# Altium PCB PCB_main_single_side_STACK.PcbDoc (part 2 of 2)
Units mm, origin at the board's own origin, x right, y up, seen from the top; angles counter-clockwise.
Board outline 58 x 37 mm, 2 copper layers (Top Layer, Bottom Layer), stack 1.571 mm thick; 67 components, 56 nets, 287 pads, 90 vias.
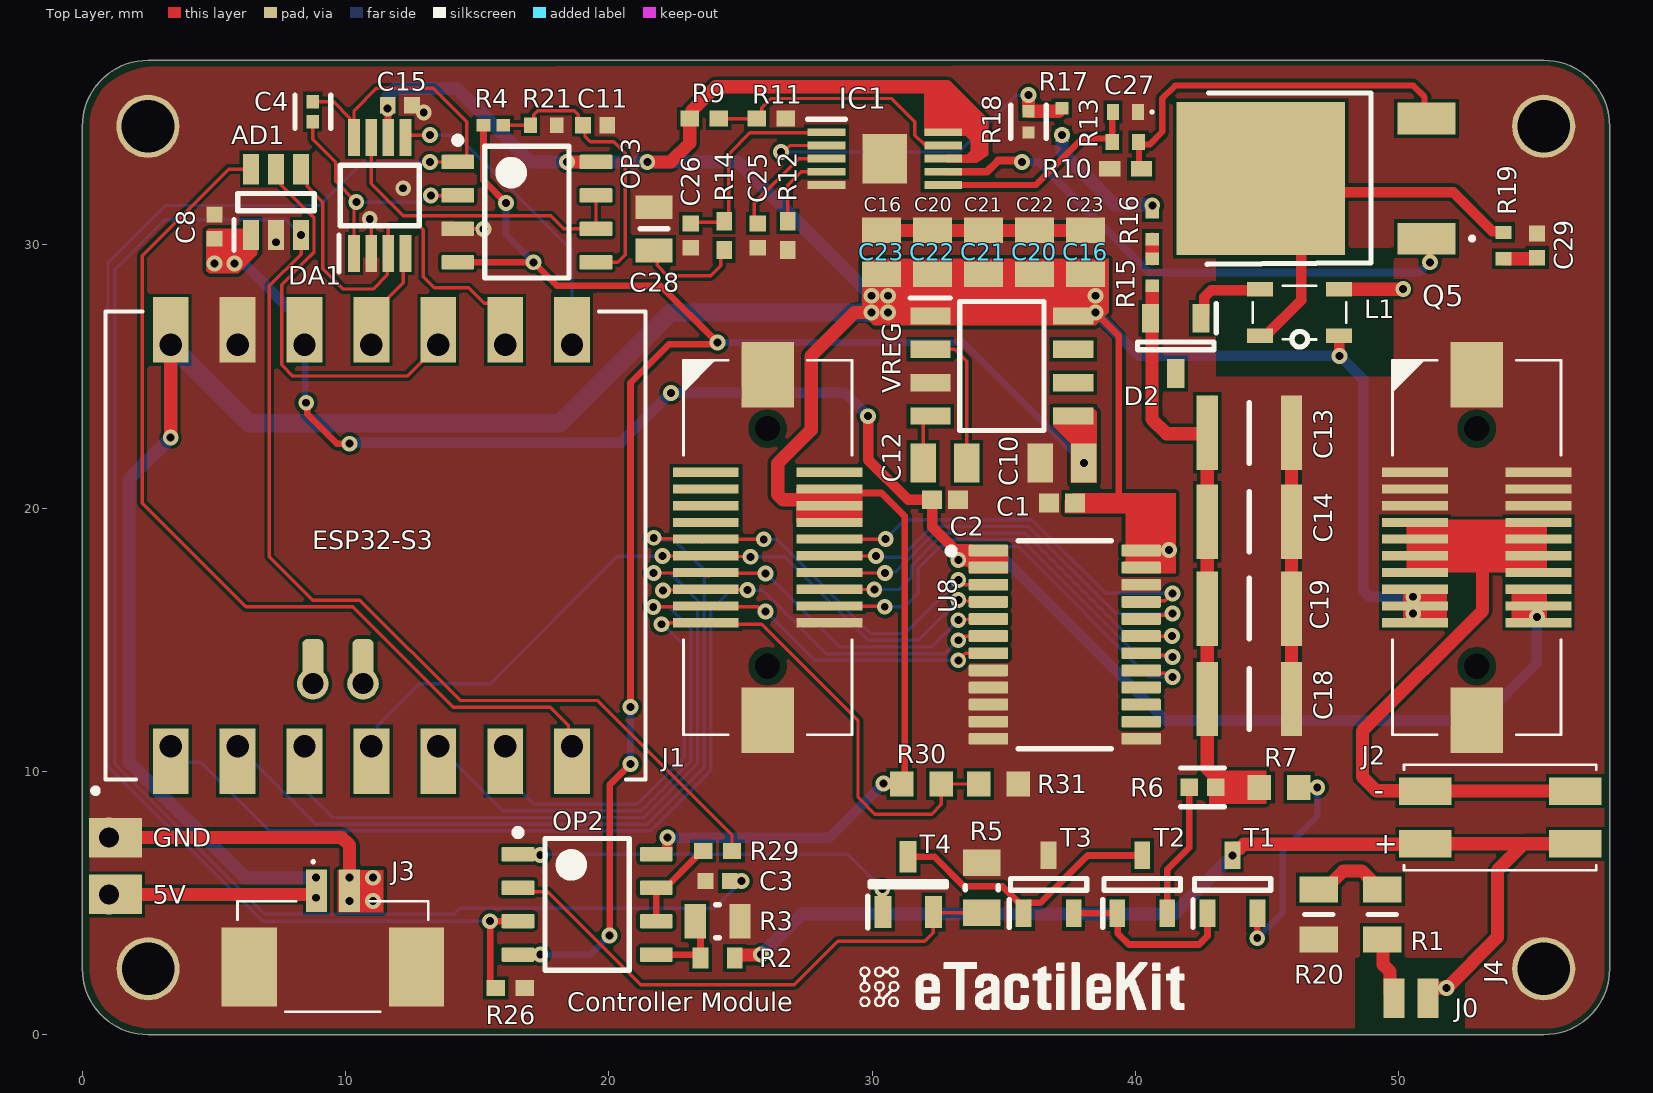
[diagram p0: Top Layer view]

## Via types
v1: diameter 0.6, hole 0.3, Top Layer to Bottom Layer, tented both sides, 90 vias

## Nets (pads, with @x,y where several pads share a name; then routed paths per layer and width w, separated by ;. In a path a pad name is that pad's centre, name@x,y a point inside that pad or via, vN(x,y) a via of type N, cw(c..) or ccw(c..) an arc to the next point about the centre after c; other vN are vias at no path point) (continued)
NetC28_2: (continued)
  Top Layer w0.127: C28.2 21.838,29.666 21.838,29.216 22.225,28.829 23.876,28.829 24.249,29.202 R14.1@24.249,29.668
  Top Layer w0.254: R14.1@24.249,29.668 R14.1
NetC29_2: C29.2 R19.2 | length 1.1
  Top Layer w0.5: R19.2 C29.2@55.051,29.472
NetD2_1: D2.1 L1.2 | length 3.1
  Top Layer w0.4: D2.1 42.614,27.337 42.614,28.009 42.885,28.28 44.701,28.28 L1.2
NetIC1_4: IC1.4 R12.2 | length 3.2
  Top Layer w0.127: R12.2 26.797,32.258 27.313,32.774 IC1.4@28.395,32.774
NetJ0_2: J0.2 R1.1 | length 2.4
  Top Layer w0.5: R1.1 49.405,3.59 49.405,2.665 49.666,2.404 49.666,1.547 J0.2
NetL1_1: L1.1 Q5.2 R19.1 | length 18
  Top Layer w0.4: L1.1 44.953,26.557 46.291,27.895 Q5.2@46.291,32.004 ; R19.1 53.929,30.522 53.552,30.522 52.07,32.004 Q5.2@46.291,32.004 ; Q5.2@45.777,32.518 Q5.2@46.291,32.004 ; Q5.2@45.777,32.518 Q5.2 Q5.2@45.777,32.518 ; Q5.2@45.777,32.518 Q5.2@46.291,32.004
NetOP2_1: OP2.1 T4.1 | length 15.3
  Top Layer w0.254: OP2.1 16.564,6.846 17.387,6.846 v1(17.399,6.833) ; v1(30.387,5.543) 30.4,5.529 30.4,4.679 T4.1@30.414,4.665
  Bottom Layer w0.127: v1(17.399,6.833) 17.424,6.858 29.071,6.858 v1(30.387,5.543)
NetOP2_2: OP2.2 R5.2 T4.2 | length 20.7
  Top Layer w0.127: OP2.2 16.7,5.44 17.674,5.44 21.209,1.905 27.051,1.905 28.702,3.556 32.004,3.556 32.324,3.876 32.324,4.609 32.352,4.637 R5.2
NetOP2_5: OP2.5 R2.1 R3.2 | length 3.2
  Top Layer w0.254: OP2.5 23.353,3.048 R2.1 23.48,4.117 R3.2
NetOP2_6: OP2.6 OP2.7 R29.1 | length 3.6
  Top Layer w0.254: OP2.6 OP2.7 22.152,5.588 23.357,6.793 23.357,6.812 23.53,6.985 R29.1
NetQ5_3: Q5.3 R10.2 R13.1 | length 14.6
  Top Layer w0.24: R13.1 R13.1@40.136,33.885 ; R13.1@40.136,33.925 R13.1@40.136,33.885 ; R10.2@40.244,32.996 40.136,33.105 R13.1@40.136,33.885 ; Q5.3 50.977,34.875 50.977,35.617 50.546,36.048 41.509,36.048 41.021,35.56 41.021,34.29 40.542,33.811 40.21,33.811 R13.1@40.136,33.885
NetR1_2: R1.2 R20.1 | length 3.1
  Top Layer w0.5: R20.1 47.185,5.522 47.886,6.223 48.605,6.223 48.898,5.93 48.898,5.772 49.098,5.572 R1.2@49.437,5.572
NetR6_1: R6.1 T2.2 | length 5
  Top Layer w0.254: T2.2 41.209,6.284 42.043,7.118 R6.1@42.043,9.271
NetR7_1: R7.1 T1.2 | length 8.3
  Top Layer w0.127: T1.2@44.625,4.602 T1.2
  Top Layer w0.254: v1(44.625,3.673) T1.2@44.625,4.602 ; R7.1 v1(46.904,9.398)
  Bottom Layer w0.254: v1(44.625,3.673) 45.593,4.641 45.593,6.985 46.904,8.296 v1(46.904,9.398)
NetR15_1: R15.1 R16.2 | length 0.8
  Top Layer w0.5: R15.1 R16.2
NetR16_1: R16.1 R17.2 | length 4.9
  Bottom Layer w0.5: v1(37.207,34.171) 37.207,33.532 39.219,31.52 40.621,31.52 v1(40.64,31.501)
NetT1_1: T1.1 T2.1 T3.2 | length 7
  Top Layer w0.254: T3.2 T2.1 39.322,4.602 39.322,3.858 39.751,3.429 42.418,3.429 42.738,3.749 T1.1
NetT2_3: T2.3 T3.1 T4.3 | length 10.7
  Top Layer w0.254: T4.3 32.37,6.765 33.495,5.64 34.953,5.64 T3.1@35.753,4.84 ; T3.1 T3.1@35.753,4.84 ; T2.3 38.184,6.815 36.382,5.013 35.926,5.013 T3.1@35.753,4.84
POL: J1.14 U8.19 | length 16.4
  Top Layer w0.127: J1.14@28.342,17.526 28.358,17.542 30.489,17.542 v1(30.494,17.537) ; U8.19@40.279,15.143 v1(41.382,15.144)
  Bottom Layer w0.127: v1(30.494,17.537) 30.535,17.579 30.892,17.579 32.363,19.05 35.814,19.05 39.72,15.144 v1(41.382,15.144)
SENSE: C27.2 IC1.6 R13.2 | length 8.2
  Top Layer w0.127: C27.2@39.116,34.968 cw(c39.229,34.968) C27.2
  Top Layer w0.24: IC1.6@32.819,32.274 36.211,32.274 37.973,34.036 38.986,34.036 R13.2@39.116,33.906
  Top Layer w0.254: R13.2 C27.2@39.116,34.968
SHDN: IC1.9 R9.1 R11.2 | length 10.1
  Top Layer w0.127: R9.1 R11.2 25.812,34.994 25.812,35.21 26.162,35.56 30.734,35.56 31.623,34.671 31.623,34.163 31.99,33.796 32.797,33.796 IC1.9@32.819,33.774
SPI_CLK: AD1.4 DA1.3 ESP32-S3.9 | length 16.6
  Top Layer w0.127: AD1.4@8.382,33.062 8.55,32.894 8.55,32.217 9.144,31.623 9.144,29.086 9.909,28.321 11.049,28.321 11.589,28.861 11.589,29.638 DA1.3 11.628,30.623 11.702,30.697 12.19,30.697 12.22,30.727 12.803,30.727 12.954,30.576 12.954,28.776 ; 12.954,28.794 13.379,28.368 14.685,28.368 15.27,27.783 15.628,27.783 16.066,27.345 ESP32-S3.9@16.066,26.774
STACK_SENSE: ESP32-S3.6 J1.19 R30.1 R31.2 | length 31.1
  Top Layer w0.127: v1(21.998,15.594) 22.048,15.644 J1.19@23.684,15.644 ; J1.19@24.809,15.594 25.802,15.594 29.464,11.932 29.464,9.017 30.099,8.382 32.258,8.382 32.627,8.751 R30.1 R31.2
  Bottom Layer w0.127: ESP32-S3.6@16.066,10.963 16.066,9.842 17.145,8.763 21.082,8.763 22.86,10.541 22.86,14.789 22.055,15.594 v1(21.998,15.594)
Vout: C4.1 DA1.8 OP2.3 OP3.1 R26.1 | length 64.5
  Top Layer w0.127: C4.1 9.552,35.431 10.166,34.816 10.166,34.714 10.226,34.654 DA1.8@10.328,34.654 ; DA1.8 DA1.8@10.328,34.654 ; v1(13.208,33.147) OP3.1 14.393,33.147 14.605,33.359 14.605,34.671 13.335,35.941 11.176,35.941 10.328,35.093 DA1.8@10.328,34.654
  Top Layer w0.254: R26.1 15.667,1.778 15.494,1.951 v1(15.494,4.318) OP2.3
  Bottom Layer w0.127: v1(13.208,33.147) 10.668,33.147 9.017,31.496 3.175,31.496 0.983,29.304 0.983,10.193 6.858,4.318 v1(15.494,4.318)
VPP: J2.7 J2.8 J2.9 J2.10 J2.11 J2.12 J2.13 J2.14 J4.1 J4.MP1 | length 20.3
  Top Layer w0.5: J2.11@51.245,18.035 51.32,18.109 51.862,18.109 51.866,18.114 52.734,18.114 52.813,18.034 52.887,18.034 53.18,17.741 53.18,16.107 48.615,11.542 48.615,9.805 49.149,9.271 50.982,9.271 J4.MP1 J4.1
Vref: DA1.7 OP3.6 OP3.7 | length 11.9
  Top Layer w0.127: DA1.7@10.978,33.696 10.978,32.329 12.204,31.103 17.792,31.103 18.288,30.607 OP3.6 OP3.7
pads on no net: D2.3 J1.1 J1.2 J1.3 J1.5 J1.7 J1.23 J1.24 J2.23 J2.24 U8.14 U8.15 U8.16 VREG.6 VREG.7

## Polygon pours and split planes (outlines as drawn)
GND on Top Layer "GND_L01_P000" (solid, pour order 0): 0.284,34.533 cw(c2.613,34.466) 0.89,36.035 cw(c2.802,33.937) 2.949,36.772 55.366,36.828 cw(c55.366,34.289) 57.162,36.084 57.18,36.066 cw(c55.648,34.533) 57.815,34.533 57.815,2.66 cw(c55.487,2.569) 56.629,0.539 cw(c55.689,1.935) 55.721,0.252 2.594,0.252 cw(c2.634,2.753) 0.914,0.937 cw(c2.809,2.606) 0.284,2.593
GND on Bottom Layer "GND_L02_P001" (solid, pour order 1): 0.277,34.645 cw(c2.606,34.578) 0.883,36.147 cw(c2.795,34.05) 2.942,36.885 55.359,36.94 cw(c55.359,34.401) 57.155,36.196 57.173,36.178 cw(c55.641,34.646) 57.808,34.645 57.808,2.772 cw(c55.48,2.682) 56.622,0.652 cw(c55.682,2.047) 55.714,0.364 2.587,0.364 cw(c2.627,2.865) 0.907,1.05 cw(c2.802,2.718) 0.277,2.706

## Other copper
Top Layer:
  region net GND: 9.703,6.257 9.703,4.658 10.588,4.658 11.43,4.658 11.43,6.264
  region net +5V: 31.98,34.139 33.552,34.139 33.742,33.949 33.742,33.573 33.584,33.416 32.819,33.416 32.819,33.127 33.974,33.127 34.417,33.401 34.417,34.681 31.98,36.241
  region net +5V: 50.165,16.954 50.165,15.557 51.816,15.557 51.816,16.954
  region net +5V: 37.317,20.299 37.592,20.574 39.243,20.574 39.497,20.574 41.529,20.574 41.529,17.526 39.624,17.526 39.624,19.812 37.317,19.812
  region net +5V: 29.622,28.412 29.622,27.376 30.058,26.94 33.036,26.94 38.497,26.94 38.99,27.433 38.99,29.464 29.845,29.464 29.718,29.337
  region net +5V: 27.115,20.752 29.621,20.752 29.621,19.452 27.115,19.452
  region net VPP: 50.292,19.558 55.626,19.558 55.626,17.564 50.292,17.564
  pour cut-out: 48.323,2.921 48.323,0.127 52.514,0.127 52.514,2.921
  region net -5: 36.891,23.819 38.383,23.819 38.538,23.665 38.538,20.967 37.56,20.967 37.545,20.982 37.545,22.452 36.876,23.121 36.876,23.812
  region net +3V3: 4.719,30.534 4.793,30.607 6.568,30.607 6.659,30.516 6.659,29.652 5.925,28.918 4.822,28.918 4.721,29.019 4.721,30.533
  region net +3V3: 33.679,17.526 33.679,17.704 33.589,17.794 33.133,17.794 33.019,17.908 33.019,18.528 33.525,18.528 33.765,18.288
  region net +3V3: 33.679,18.462 33.679,17.526 35.165,17.526 35.165,18.558 33.674,18.558
  region net +3V3: 54.285,16.934 54.285,15.643 55.626,15.643 55.626,16.934
  region net +300V: 44.831,10.033 42.799,10.033 42.799,9.626 42.799,9.017 42.799,8.775 44.958,8.775 44.958,8.89 44.958,10.033
Bottom Layer:
  region net +5V: 29.622,27.376 cw(c29.698,27.452) 29.591,27.452 29.591,28.194 cw(c30.187,27.785) 29.793,28.391 cw(c30.139,27.399) 30.204,28.448 30.607,28.448 cw(c30.587,28.014) 30.908,28.307 30.988,28.194 cw(c30.422,28.001) 31.019,27.962 cw(c30.959,27.949) 31.019,27.937 31.019,27.434 cw(c30.673,27.447) 30.908,27.193 cw(c30.624,27.395) 30.681,27.051 30.48,27.051 29.655,27.088 ccw(c29.514,27.056) 29.591,27.178
  region net +5V: 9.271,4.953 9.271,6.223 8.636,6.223 8.636,4.953
Multi-Layer:
  pour cut-out: 43.064,29.809 43.064,25.019 49.784,25.019 49.784,29.883

## Silkscreen, mask and mechanical layers (free items; w line width, h text height)
Top Overlay:
  drawing of 28 lines, arcs and shapes, not listed
  text "C16" at 29.69,31.265 h0.52
  text "C20" at 31.595,31.265 h0.52
  text "C21" at 33.5,31.265 h0.52
  text "C22" at 35.464,31.265 h0.52
  text "C23" at 37.372,31.265 h0.52
  text "-" at 49.048,8.897 h0.8
  text "GND" at 2.693,7.138 h0.7
  text "+" at 49.048,6.878 h0.8
  text "5V" at 2.693,4.979 h0.7
  text "Controller Module" at 18.415,0.648 h1.2
Bottom Overlay:
  drawing of 46 lines, arcs and shapes, not listed
  text "Visit Us" at 43.447,16.638 h1.2 r270
  text "http://aid-lab.org/etactilekit" at 46.223,8.001 h2 r270
  text "Rev_1.0" at 11.684,1.409 h1.5
Mechanical 1:
  the board outline again, w0.254